# Altium PCB TS808.PcbDoc
Units mm, origin at the board's own origin, x right, y up, seen from the top; angles counter-clockwise.
Board outline 82 x 126 mm, 2 copper layers (Top Layer, Bottom Layer); 50 components, 32 nets, 123 pads, 31 vias.
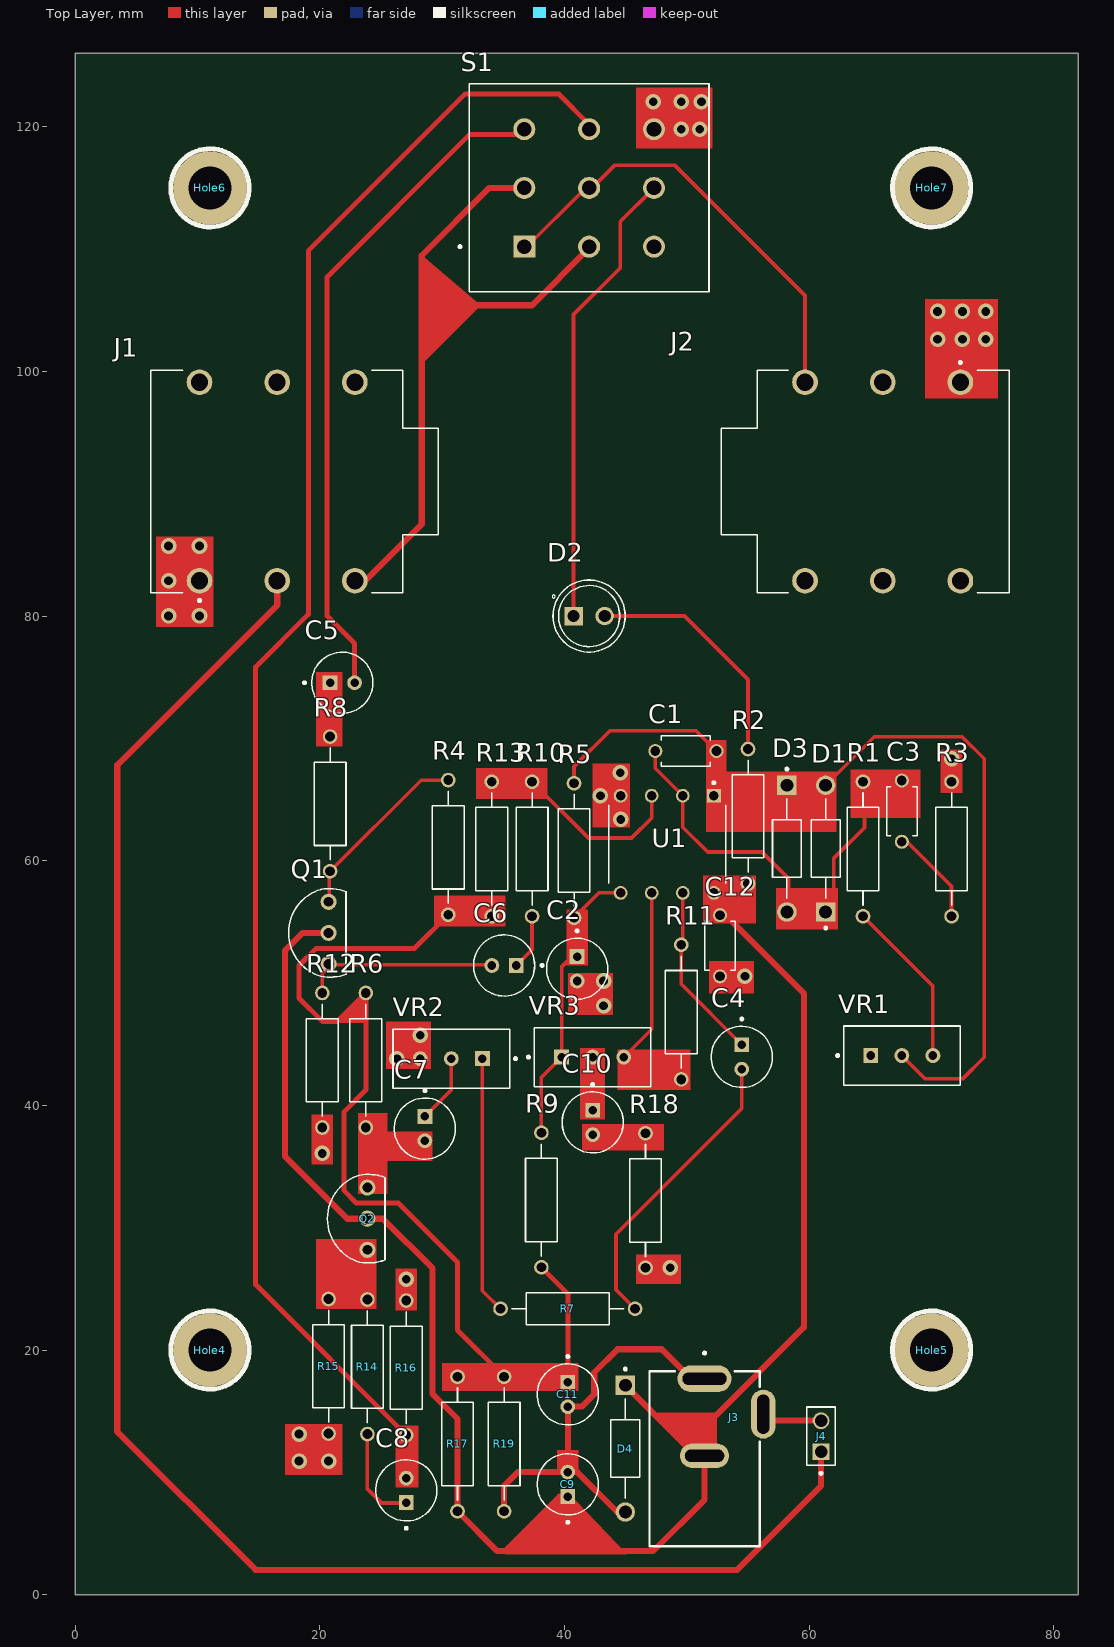
[diagram p0: Top Layer view]
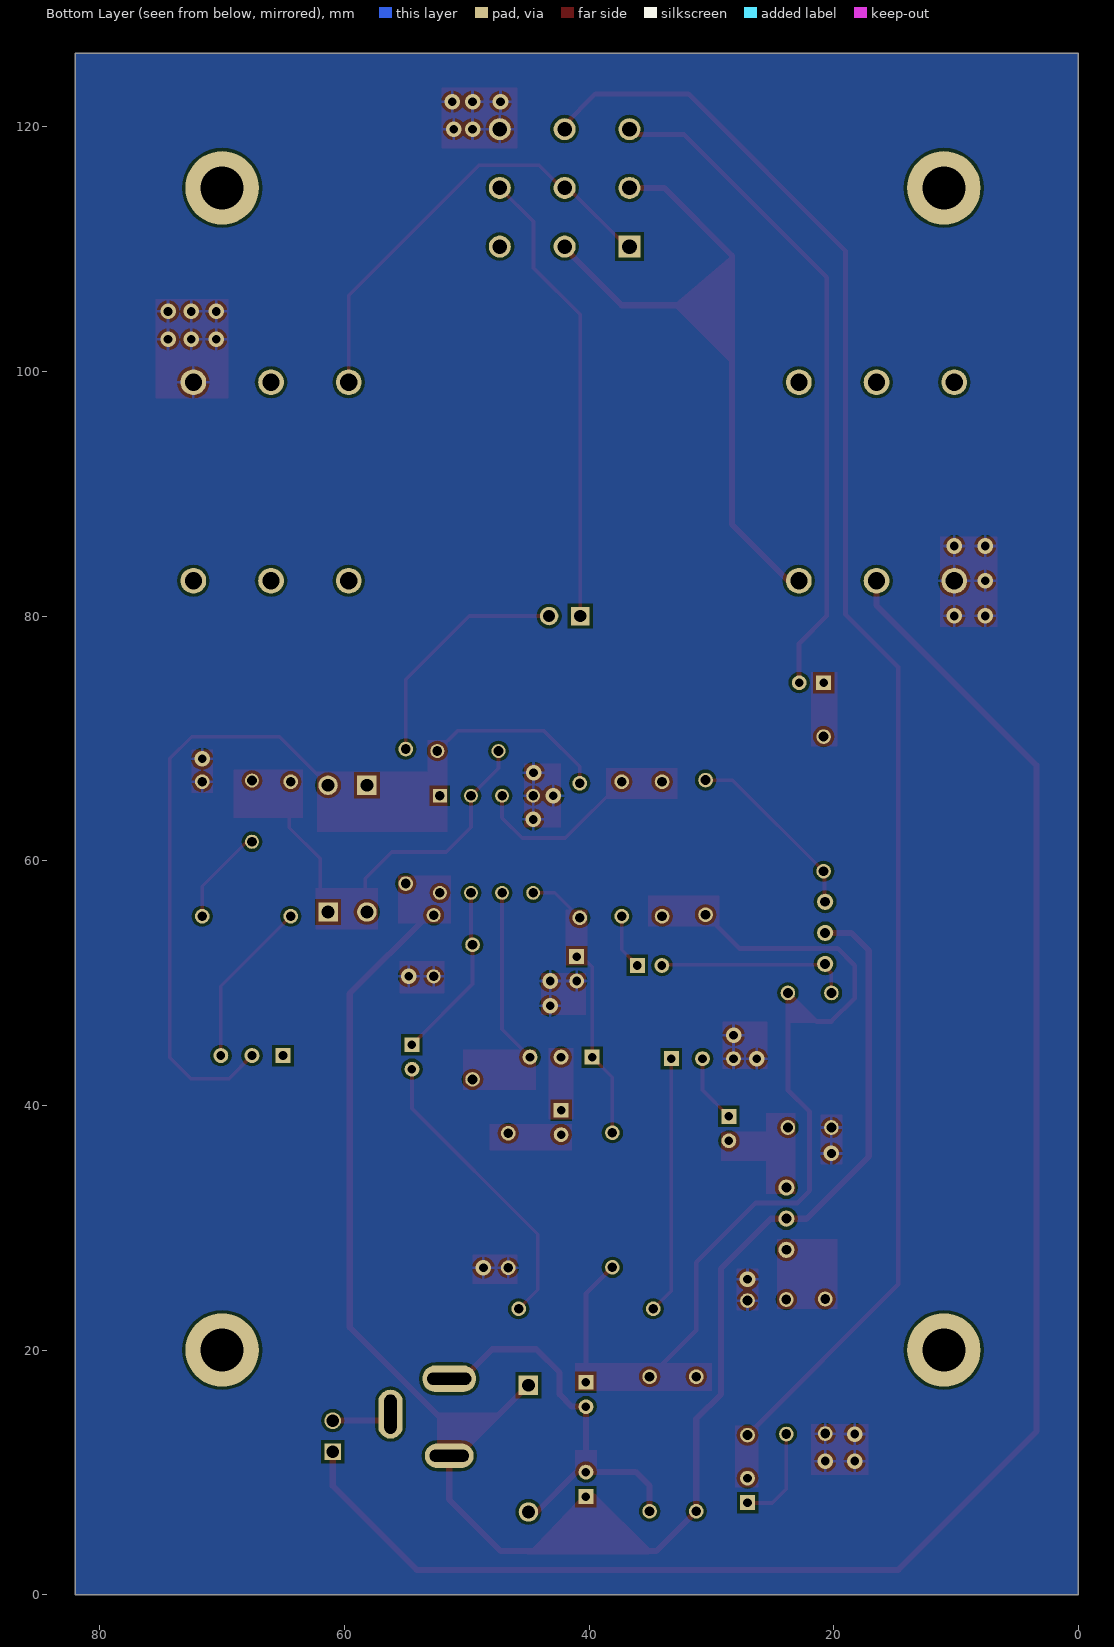
[diagram p1: Bottom Layer view, seen from below]
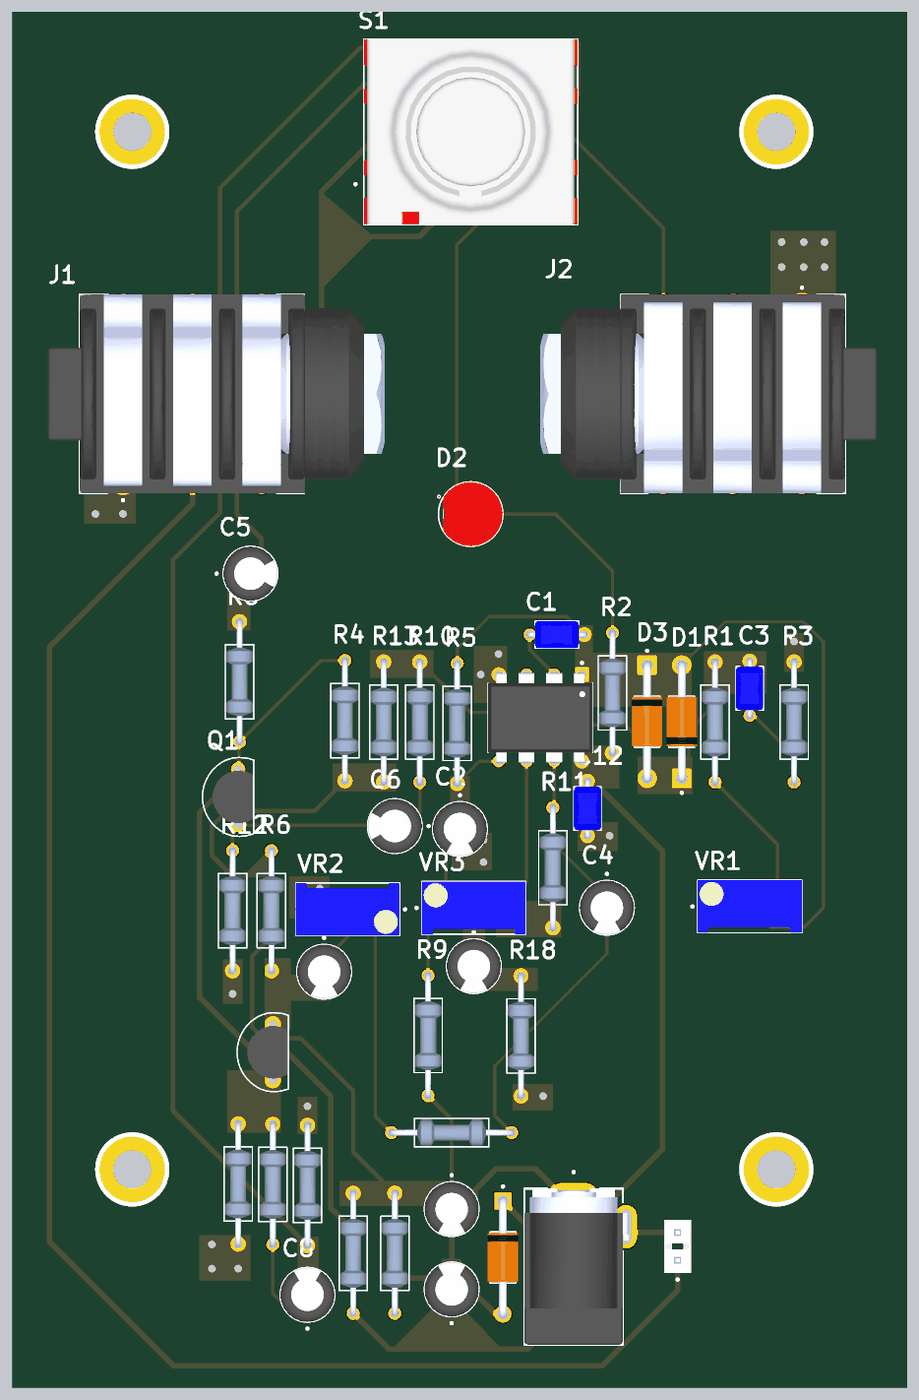
[diagram p2: 3D render of the assembled board from above, using the file's embedded part models]

## Layer stack, top to bottom
Top Solder: solder mask 0.0102, Solder Resist, Dk 3.5
Top Layer: signal copper 0.0356
Dielectric 1: dielectric 0.32, FR-4, Dk 4.8
Bottom Layer: signal copper 0.0356
Bottom Solder: solder mask 0.0102, Solder Resist, Dk 3.5

## Board outline
0,0 0,126 82,126 82,0

## Design rules (kind name [scope] priority, off if disabled: settings)
Clearance [All] p1: gap=0.254 ignorepadtopadclearanceinfootprint=FALSE except(0: Arc-Hole Track-Hole SMDPad-Hole THPad-Hole Via-Hole Fill-Hole Poly-Hole Region-Hole Text-Hole)
Height [All] p1: minheight=0 maxheight=50 prefheight=12.7
HoleSize [All] p1: absolutevalues=TRUE maxlimit=5 minlimit=0.025 maxpercent=80.000 minpercent=20.000
PolygonConnect [All] p1: connectstyle=Relief reliefconductorwidth=0.254 reliefentries=4 polygonreliefangle="90 Angle" airgapwidth=0.254
RoutingVias [All] p1: holewidth=0.711 width=1.27 viastyle="Through Hole" minholewidth=0.711 minwidth=1.27 maxholewidth=0.711 maxwidth=1.27
SolderMaskExpansion [All] p1: expansion=0.102
Width [All] p1: maxlimit=2 minlimit=0.3 preferedwidth=0.3 minimp=50.000000 maximp=50.000000 favimp=50.000000
28 further rules are at their usual default settings.

## Classes and differential pairs
component class TS808: C1 C2 C3 C4 C5 C6 C7 C8 C9 C10 C11 C12 D1 D2 D3 D4 J1 J2 J3 J4 Q1 Q2 R1 R2 R3 R4 R5 R6 R7 R8 R9 R10 R11 R12 R13 R14 R15 R16 R17 R18 R19 S1 U1 VR1 VR2 VR3

## Components (designator, comment, footprint, x,y, rotation, side; value= is the part's Value field where it differs from the comment)
C1 "51p" CAPRB500W50L400T250H550 49.911,68.961 r0 top
C2 "0.22" CAPPRD200W50D550H1250 41.021,51.165 r270 top
C3 "0.047" CAPRB500W50L400T250H550 67.564,64.048 r270 top
C4 "1uF" CAPPRD200W50D550H1250 54.483,43.958 r270 top
C5 "UVR1A470MDD" CAPPRD200W50D550H1250 21.828,74.549 r0 top
C6 "1uF" CAPPRD200W50D550H1250 35.052,51.435 r180 top
C7 "0.1" CAPPRD200W50D550H1250 28.575,38.1 r270 top
C8 "10uF" CAPPRD200W50D550H1250 27.051,8.525 r90 top
C9 "0.1uF" CAPPRD200W50D550H1250 40.259,9.017 r90 top
C10 "0.22" CAPPRD200W50D550H1250 42.291,38.608 r270 top
C11 "47uF" CAPPRD200W50D550H1250 40.259,16.367 r270 top
C12 "0.1uF" CAPRB500W50L400T250H550 52.705,53.046 r90 top
D1 "MA150" DIOAD1036W78L470D235 61.341,60.987 r90 top
D2 "LED" LED_WP7113ID 42,80 r0 top
D3 "MA150" DIOAD1036W78L470D235 58.166,60.987 r270 top
D4 "W03C" DIOAD1036W78L470D235 44.958,11.938 r270 top
Hole4 "Hole" Hole 11,20 r0 top
Hole5 "Hole" Hole 70,20 r0 top (schematic designator Hole4)
Hole6 "Hole" Hole 11,115 r0 top (schematic designator Hole4)
Hole7 "Hole" Hole 70,115 r0 top (schematic designator Hole4)
J1 "NMJ6HCD2" NEUTRIK_NMJ6HCD2 16.5,91 r180 top locked
J2 "NMJ6HCD2" NEUTRIK_NMJ6HCD2 66,91 r0 top locked
J3 "DCJ200-10-A-XX-K_REVA" GCT_DCJ200-10-A-XX-K_REVA 51.435,11.103 r0 top
J4 "3-644456-2" TE_3-644456-2 60.96,11.684 r90 top
Q1 "2SC1815" TO92 20.701,54.102 r90 top
Q2 "2SC1815" TO92 23.876,30.734 r90 top
R1 "51K" RESAD1100W55L680D260 64.389,60.96 r90 top
R2 "1k" RESAD1100W55L680D260 54.991,63.627 r90 top
R3 "4K7" RESAD1100W55L680D260 71.628,60.96 r270 top
R4 "510K" RESAD1100W55L680D260 30.48,61.087 r90 top
R5 "1K" RESAD1100W55L680D260 40.767,60.833 r90 top
R6 "510K" RESAD1100W55L680D260 23.749,43.688 r270 top
R7 "1K" RESAD1100W55L680D260 40.259,23.368 r180 top
R8 "1K" RESAD1100W55L680D260 20.828,64.643 r90 top
R9 "10K" RESAD1100W55L680D260 38.1,32.258 r270 top
R10 "RA" RESAD1100W55L680D260 37.338,60.96 r270 top
R11 "1K" RESAD1100W55L680D260 49.53,47.625 r270 top
R12 "10K" RESAD1100W55L680D260 20.193,43.688 r270 top
R13 "10K" RESAD1100W55L680D260 34.036,60.96 r270 top
R14 "100" RESAD1100W55L680D260 23.876,18.63 r270 top
R15 "10K" RESAD1100W55L680D260 20.701,18.669 r270 top
R16 "10K" RESAD1100W55L680D260 27.051,18.542 r90 top
R17 "10K" RESAD1100W55L680D260 31.242,12.319 r270 top
R18 "220" RESAD1100W55L680D260 46.609,32.219 r270 top
R19 "10K" RESAD1100W55L680D260 35.052,12.319 r90 top
S1 "FS57003PLT2B2M2QE" SW_FS57003PLT2B2M2QE 42,115 r0 top locked
U1 "RC4558P" DIP794W45P254L959H508Q8 48.387,61.341 r270 top
VR1 "500K" TRIM_3296W-1-101LF 67.564,44.069 r0 top
VR2 "100K" TRIM_3296W-1-101LF 30.734,43.815 r180 top
VR3 "20K" TRIM_3296W-1-101LF 42.291,43.942 r0 top

## Footprints (in the part's own frame and the unit in brackets; to place one, negate y for a bottom-side part, rotate by r counter-clockwise, add the part's x,y. Pads: shape width x height; smd on the part's side, far side on the other; paste and mask are expansions set on the pad)
CAPPRD200W50D550H1250 [mm]
  rect 1.208x1.208 / inner round 1.208 / far side rect 1.208x1.208 hole 0.7: 1(-1,0)
  round 1.208 hole 0.7: 2(1,0)
  silkscreen extent -3.2,-2.5 2.5,2.5, body extent -2.5,-2.5 2.5,2.5, height 12.5
CAPRB500W50L400T250H550 [mm]
  round 1.15 hole 0.8: 1(-2.5,0) 2(2.5,0)
  silkscreen extent -2,-1.25 2,1.25, body extent -2.75,-1.25 2.75,1.25, height 5.5
DIOAD1036W78L470D235 [mm]
  round 1.59 hole 1.06: A(5.18,0)
  rect 1.59x1.59 / inner round 1.59 / far side rect 1.59x1.59 hole 1.06: C(-5.18,0)
  silkscreen extent -6.6,-1.17 4.07,1.17, body extent -5.55,-1.4 5.55,1.4, height 2.8
DIP794W45P254L959H508Q8 [mm]
  rect 1.13x1.13 / inner round 1.13 / far side rect 1.13x1.13 hole 0.78 mask+0.102: 1(-3.97,3.81)
  round 1.13 hole 0.78 mask+0.102: 2(-3.97,1.27) 3(-3.97,-1.27) 4(-3.97,-3.81) 5(3.97,-3.81) 6(3.97,-1.27) 7(3.97,1.27) 8(3.97,3.81)
  silkscreen extent -5.13,-4.79 3.18,4.79, body extent -4.1,-4.79 4.1,4.79, height 5.08
GCT_DCJ200-10-A-XX-K_REVA [mm]
  oval 4.4x2.2 hole 1 slot 3.6 at 0 deg: 1(0,6.55)
  oval 4x2 hole 1 slot 3.2 at 0 deg: 2(0,0.25)
  oval 2x4 hole 1 slot 3.2 at 90 deg: 3(4.8,3.65)
  silkscreen extent -4.5,-7.15 4.5,8.75, body extent -4.5,-7.15 5.05,7.15, height 11
Hole [mm] "www.Pishnam.com"
  round 6 hole 3.5: 1(0,0)
  silkscreen extent -3.2,-3.2 3.2,3.2
LED_WP7113ID [mm]
  round 1.508 hole 1: A(1.27,0)
  rect 1.508x1.508 / inner round 1.508 / far side rect 1.508x1.508 hole 1: C(-1.27,0)
  silkscreen extent -3.03,-2.95 2.95,2.95, body extent -2.5,-2.95 2.95,2.95, height 9.6
NEUTRIK_NMJ6HCD2 [mm]
  round 2.1 hole 1.4: R(0,8.115) RN(0,-8.115) S(6.35,8.115) SN(6.35,-8.115) T(-6.35,8.115) TN(-6.35,-8.115)
  silkscreen extent -13.18,-9.1 10.35,9.83, body extent -17.64,-9.1 13.23,9.1, height 15.67
RESAD1100W55L680D260 [mm]
  round 1.2 hole 0.8: 1(-5.5,0) 2(5.5,0)
  silkscreen extent -4.58,-1.3 4.58,1.3, body extent -5.77,-1.2 5.77,1.2, height 2.4
SW_FS57003PLT2B2M2QE [mm]
  rect 1.8x1.8 / inner round 1.8 / far side rect 1.8x1.8 hole 1.2 mask+0.102: 1(-5.3,-4.8)
  round 1.8 hole 1.2 mask+0.102: 2(-5.3,0) 3(-5.3,4.8) 4(0,-4.8) 5(0,0) 6(0,4.8) 7(5.3,-4.8) 8(5.3,0) 9(5.3,4.8)
  silkscreen extent -10.65,-8.5 9.8,8.5, body extent -9.8,-8.5 9.8,8.5, height 37
TE_3-644456-2 [mm]
  rect 1.37x1.37 / inner round 1.37 / far side rect 1.37x1.37 hole 1.02: 1(0,0)
  round 1.37 hole 1.02: 2(2.54,0)
  silkscreen extent -1.87,-1.17 3.66,1.17, body extent -1.12,-1.17 3.66,1.17, height 10.03
TO92 [mil]
  round 52 hole 32: 1(-100,0) 2(0,0) 3(100,0)
  silkscreen extent -142,-57 142,129, body extent -95,-53 95,92, height 210
TRIM_3296W-1-101LF [mm]
  rect 1.218x1.218 / inner round 1.218 / far side rect 1.218x1.218 hole 0.71: 1(-2.54,0)
  round 1.218 hole 0.71: 2(0,0) 3(2.54,0)
  silkscreen extent -5.35,-2.41 4.76,2.42, body extent -4.76,-2.41 4.76,2.42, height 11.55

## Part data
C1 C3 C12: library part FG28C0G1H330JNT06, "33 pF ±5% 50V Ceramic Capacitor C0G, NP0 Radial", Package="RADIAL-2 TDK", Check_prices=https://www.snapeda.com/parts/FG28C0G1H330JNT06/TDK/view-part/?ref=eda, MF=TDK, MP=FG28C0G1H330JNT06, SnapEDA_Link=https://www.snapeda.com/parts/FG28C0G1H330JNT06/TDK/view-part/?ref=snap
C2 C4 C6 C7 C8 C9 C10 C11: library part UVR1A470MDD, "47 µF 10 V Aluminum Electrolytic Capacitors Radial, Can - 2000 Hrs @ 85°C", Package="RADIAL-2 NICHICON", Check_prices=https://www.snapeda.com/parts/UVR1A470MDD/Nichicon/view-part/?ref=eda, MF=Nichicon, MP=UVR1A470MDD, SnapEDA_Link=https://www.snapeda.com/parts/UVR1A470MDD/Nichicon/view-part/?ref=snap
C5: "47 µF 10 V Aluminum Electrolytic Capacitors Radial, Can - 2000 Hrs @ 85°C", Package="RADIAL-2 NICHICON", Check_prices=https://www.snapeda.com/parts/UVR1A470MDD/Nichicon/view-part/?ref=eda, MF=Nichicon, MP=UVR1A470MDD, SnapEDA_Link=https://www.snapeda.com/parts/UVR1A470MDD/Nichicon/view-part/?ref=snap
D1 D3 D4: library part 1N5819, "1A, 40V, Planar Schottky", Package="DO-41-2 Taiwan Semiconductor", Check_prices=https://www.snapeda.com/parts/1N5819/taiwan/view-part/?ref=eda, MF="Taiwan Semiconductor", MP=1N5819, SnapEDA_Link=https://www.snapeda.com/parts/1N5819/taiwan/view-part/?ref=snap
D2: library part WP7113ID, "Red 617nm LED Indication - Discrete 2V Radial", Package="Radial Kingbright", Availability="In Stock", Check_prices=https://www.snapeda.com/parts/WP7113ID/Kingbright/view-part/?ref=eda, MF=Kingbright, MP=WP7113ID, Price=None, Purchase-URL=https://pricing.snapeda.com/search/part/WP7113ID/?ref=eda, SnapEDA_Link=https://www.snapeda.com/parts/WP7113ID/Kingbright/view-part/?ref=snap
Hole4 Hole5 Hole6 Hole7: "ja pich", ШСЗНн КжУШ="гедПУ гНгП СЭнЪн", жИ УЗнК=www.Pishnam.com, ˜ÇäÇá Êá�ÑÇã=@Pishnam
J1 J2: "1/4 stereo jack, switched, with chrome ferrule and straight PCB pins, mounting nut included", Package=None, Availability="In Stock", Check_prices=https://www.snapeda.com/parts/NMJ6HCD2/Neutrik/view-part/?ref=eda, MF=Neutrik, MP=NMJ6HCD2, Price=None, Purchase-URL=https://pricing.snapeda.com/search/part/NMJ6HCD2/?ref=eda, SnapEDA_Link=https://www.snapeda.com/parts/NMJ6HCD2/Neutrik/view-part/?ref=snap
J3: "Power Barrel Connector Jack 2.05mm ID (0.081), 5.50mm OD (0.217) Through Hole, Right Angle", Package=None, Check_prices=https://www.snapeda.com/parts/DCJ200-10-A-K1-K/Global+Connector+Technology/view-part/?ref=eda, MF="Global Connector Technology", MP=DCJ200-10-A-K1-K, SnapEDA_Link=https://www.snapeda.com/parts/DCJ200-10-A-K1-K/Global+Connector+Technology/view-part/?ref=snap
J4: "HEADER ASSEMBLY, NARROW, MTA-100, 2 POSITION, STRAIGHT", Package=None, Check_prices=https://www.snapeda.com/parts/3-644456-2/TE+Connectivity+AMP+Connectors/view-part/?ref=eda, MF="TE Connectivity", MP=3-644456-2, SnapEDA_Link=https://www.snapeda.com/parts/3-644456-2/TE+Connectivity+AMP+Connectors/view-part/?ref=snap
Q1 Q2: "TRANS NPN ECB 150mA 60V TO-92", Package=None, Check_prices=https://www.snapeda.com/parts/2SC1815/Techno/view-part/?ref=eda, MF="Lumimax Optoelectronic Technology", MP=2SC1815, SnapEDA_Link=https://www.snapeda.com/parts/2SC1815/Techno/view-part/?ref=snap
R1 R2 R3 R4 R5 R6 R7 R8 R9 R10 R11 R12 R13 R14 R15 R16 R17 R18 R19: library part MFR-25FBF52-10K, "10.2 kOhms ±1% 0.25W, 1/4W Through Hole Resistor Axial - Metal Film", Package="RADIAL-2 YAGEO", Check_prices=https://www.snapeda.com/parts/MFR-25FBF52-10K/Yageo/view-part/?ref=eda, MF=Yageo, MP=MFR-25FBF52-10K, SnapEDA_Link=https://www.snapeda.com/parts/MFR-25FBF52-10K/Yageo/view-part/?ref=snap
S1: "PUSHBUTTON, 1A, 9VDC 3PDT, On-On, Panel Mount, Rear", Package=None, Check_prices=https://www.snapeda.com/parts/FS57003PLT2B2M2QE/E-Switch/view-part/?ref=eda, MF="e-switch inc", MP=FS57003PLT2B2M2QE, SnapEDA_Link=https://www.snapeda.com/parts/FS57003PLT2B2M2QE/E-Switch/view-part/?ref=snap
U1: "Dual, 30-V, 3-MHz, low noise (8-nV/√Hz) operational amplifier", Package="PDIP-8 Texas", Check_prices=https://www.snapeda.com/parts/RC4558P/Texas+Instruments/view-part/?ref=eda, MF="Texas Instruments", MP=RC4558P, SnapEDA_Link=https://www.snapeda.com/parts/RC4558P/Texas+Instruments/view-part/?ref=snap
VR1 VR2 VR3: library part 3296W-1-101LF, "3/8 Sq, Thru-Hole, TRIMMER, 100 ohms, Cermet, 25 Turns, Pwr-Rtg 0.5W", Package="NON STANDARD-3 Bourns", Check_prices=https://www.snapeda.com/parts/3296W-1-101LF/Bourns/view-part/?ref=eda, MF=Bourns, MP=3296W-1-101LF, SnapEDA_Link=https://www.snapeda.com/parts/3296W-1-101LF/Bourns/view-part/?ref=snap

## Via types
v1: diameter 1.27, hole 0.711, Top Layer to Bottom Layer, tented both sides, 31 vias

## Nets (pads, with @x,y where several pads share a name; then routed paths per layer and width w, separated by ;. In a path a pad name is that pad's centre, name@x,y a point inside that pad or via, vN(x,y) a via of type N, cw(c..) or ccw(c..) an arc to the next point about the centre after c; other vN are vias at no path point)
2OUT: C4.1 R11.1 U1.7 | length 14.5
  Top Layer w0.3: U1.7 49.657,53.252 R11.1 49.53,49.911 C4.1
4V5: C11.1 R4.1 R6.1 R9.2 R13.2 R17.1 R19.2 | length 73.6
  Top Layer w0.4: R4.1 27.725,52.832 19.685,52.832 18.288,51.435 18.288,48.768 20.193,46.863 21.424,46.863 R6.1 23.749,41.256 21.971,39.478 21.971,33.02 22.987,32.004 26.416,32.004 31.242,27.178 31.242,21.629 R19.2 ; R9.2 40.259,24.599 C11.1
AudioIn: J1.T S1.2 S1.4 | length 55.7
  Top Layer w0.5: J1.T 23.703,82.885 28.321,87.503 28.321,105.41 37.338,105.41 41.904,109.976 S1.4@42.225,109.976 ; 28.321,105.537 28.321,109.474 33.847,115 S1.2 S1.2@36.703,115
BAT+: J3.3 J4.2 | length 4.9
  Top Layer w0.5: J3.3 56.764,14.224 J4.2
BAT-: J1.R J4.1 | length 142.8
  Top Layer w0.5: J1.R@16.51,82.885 16.51,80.899 3.429,67.818 3.429,13.335 14.732,2.032 54.102,2.032 60.96,8.89 J4.1
CircuitIn: C5.2 S1.3 | length 55.1
  Top Layer w0.4: C5.2 22.828,77.756 20.574,80.01 20.574,107.696 32.258,119.38 36.677,119.38 S1.3@36.703,119.354
CircuitOut: C8.2 R16.1 S1.6 | length 133.6
  Top Layer w0.4: R16.1 14.732,25.361 14.732,75.819 19.05,80.137 19.05,109.855 31.877,122.682 39.497,122.682 42.003,120.176 S1.6@42.003,119.634
GND: C2.2 C12.1 J1.S J2.S R3.1 R12.2 R15.2 R16.2 R18.2 S1.9 U1.4 VR2.3 | length 1.7
  Top Layer w0.3: v1(42.926,65.311) U1.4
  other v1: 18.288,10.922 20.701,10.922 18.288,13.13 27.051,25.781 48.641,26.719 20.193,36.068 26.289,43.815 28.194,45.72 43.18,48.133 43.18,50.165 54.737,50.546 44.577,63.373 44.544,67.183 71.628,68.326 7.62,80.01 10.15,80.01 7.62,82.885 7.62,85.725 10.15,85.725 70.485,102.616 72.517,102.616 74.422,102.616 70.485,104.902 72.517,104.902 74.422,104.902 49.53,119.8 51.054,119.8 47.244,122.047 49.53,122.047 51.181,122.047
IN1+: R10.1 R13.1 U1.3 | length 14.2
  Top Layer w0.3: R10.1 41.949,61.849 45.466,61.849 47.117,63.5 U1.3
IN2+: C2.1 R5.1 R9.1 U1.5 VR3.1 | length 20.5
  Top Layer w0.3: R9.1 38.1,42.291 VR3.1 39.751,51.308 40.608,52.165 C2.1 ; R5.1 42.805,57.371 U1.5
IN2-: R11.2 U1.6 VR3.3 | length 14.4
  Top Layer w0.3: VR3.3 47.117,46.228 U1.6
Jack_pin1: C9.2 C11.2 D4.A J3.1 R19.1 | length 34.3
  Top Layer w0.5: R19.1 35.052,8.89 36.195,10.033 40.243,10.033 C9.2 ; D4.A 44.296,6.758 41.037,10.017 C9.2 ; J3.1 50.335,17.653 47.922,20.066 44.323,20.066 42.418,18.161 42.418,16.383 41.408,15.373 40.265,15.373 C11.2 C9.2
Jack_pin2: C9.1 C12.2 D4.C J3.2 Q1.2 Q2.2 R2.1 R17.2 U1.8 | length 148.9
  Top Layer w0.5: Q1.2 18.581,54.102 17.145,52.666 17.145,35.814 22.225,30.734 Q2.2 25.146,30.734 29.21,26.67 29.21,16.395 31.242,14.363 R17.2 34.505,3.556 35.141,3.556 39.602,8.017 C9.1 40.259,5.908 42.611,3.556 47.222,3.556 51.435,7.769 J3.2 ; D4.C 50.723,11.353 J3.2 ; C12.2 53.166,55.546 59.563,49.149 59.563,21.844 52.185,14.466 52.185,12.046 51.492,11.353 J3.2
LED-: D2.C S1.8 | length 37.7
  Top Layer w0.3: D2.C 40.73,104.644 44.544,108.458 44.544,112.244 S1.8
NetC1_1: C1.1 C3.1 D1.C D3.A R1.2 U1.2 | length 32.3
  Top Layer w0.3: C1.1 47.411,67.557 U1.2 49.657,62.738 51.689,60.706 56.134,60.706 58.293,58.547 58.293,55.934 D3.A ; D1.C 61.986,56.452 61.986,60.172 64.516,62.702 64.516,66.333 R1.2
NetC1_2: C1.2 D1.A D3.C R5.2 U1.1 VR1.2 | length 62.9
  Top Layer w0.3: R5.2 40.767,67.691 43.688,70.612 50.76,70.612 C1.2 ; D1.A 65.317,70.143 72.478,70.143 74.295,68.326 74.295,43.942 72.517,42.164 69.469,42.164 VR1.2
NetC3_2: C3.2 R3.2 | length 8
  Top Layer w0.3: C3.2 67.992,61.548 71.628,57.912 R3.2
NetC4_2: C4.2 R7.1 | length 24.5
  Top Layer w0.3: R7.1 44.196,24.931 44.196,29.464 54.483,39.751 C4.2
NetC5_1: C5.1 R8.2
NetC6_1: C6.1 R10.2 | length 4.6
  Top Layer w0.3: C6.1 37.338,52.721 R10.2
NetC6_2: C6.2 Q1.1 R12.1 | length 16
  Top Layer w0.3: R12.1 20.193,50.778 20.701,51.286 Q1.1 20.764,51.498 33.988,51.498 C6.2
NetC7_1: C7.1 VR2.2 | length 5.6
  Top Layer w0.3: C7.1 30.734,41.259 VR2.2
NetC7_2: C7.2 Q2.3 R6.2
NetC8_1: C8.1 R14.2 | length 8.2
  Top Layer w0.3: R14.2 23.876,8.636 25.019,7.493 27.019,7.493 C8.1
NetC10_1: C10.1 VR3.2
NetC10_2: C10.2 R18.1
NetD2_A: D2.A R2.2 | length 19.5
  Top Layer w0.3: D2.A 49.794,80 54.991,74.803 R2.2
NetQ1_3: Q1.3 R4.2 R8.1 | length 15.3
  Top Layer w0.3: Q1.3 20.764,56.706 20.764,59.08 R8.1 28.272,66.587 R4.2
NetQ2_1: Q2.1 R14.1 R15.1
NetR1_1: R1.1 VR1.3 | length 13.8
  Top Layer w0.3: R1.1 70.104,49.745 VR1.3
NetR7_2: R7.2 VR2.1 | length 21.1
  Top Layer w0.3: VR2.1 33.274,24.853 R7.2
OutJack: J2.T S1.1 S1.5 | length 37.5
  Top Layer w0.3: S1.1@36.703,109.754 36.703,109.974 41.729,115 S1.5 42.229,115 44.069,116.84 49.022,116.84 59.65,106.212 J2.T
pads on no net: Hole4.1 Hole5.1 Hole6.1 Hole7.1 J1.RN J1.SN J1.TN J2.R J2.RN J2.SN J2.TN S1.7 VR1.1

## Polygon pours and split planes (outlines as drawn)
GND on Bottom Layer "GND_L02_P002" (solid, remove dead copper, pour order 2): 0,0 82,0 82,126 0,126

## Other copper
Top Layer:
  rectangle net GND: 45.847,25.4 49.53,27.813
  rectangle net GND: 45.847,118.237 52.07,123.19
  rectangle net GND: 19.304,35.179 21.082,39.243
  rectangle net GND: 25.4,42.958 29.083,46.863
  rectangle net GND: 51.816,49.149 55.499,51.816
  rectangle net GND: 40.259,47.371 43.942,50.8
  rectangle net GND: 42.291,62.702 45.339,67.945
  rectangle net GND: 70.739,65.532 72.517,69.088
  rectangle net GND: 6.604,79.121 11.303,86.487
  rectangle net GND: 69.469,97.79 75.438,105.918
  rectangle net GND: 26.162,23.241 27.94,26.67
  rectangle net GND: 17.145,9.779 21.844,13.97
  rectangle net Jack_pin1: 39.37,9.779 41.148,11.811
  rectangle net 4V5: 29.972,16.637 41.148,18.923
  rectangle net NetC10_2: 41.402,36.322 48.133,38.481
  rectangle net NetC10_1: 41.275,38.862 43.307,44.704
  rectangle net CircuitOut: 26.162,8.763 28.067,13.843
  rectangle net NetQ2_1: 19.685,23.368 24.638,29.083
  rectangle net NetC7_2: 23.749,35.433 29.21,37.846
  rectangle net NetC7_2: 23.114,32.766 25.527,39.37
  rectangle net NetC5_1: 19.685,69.342 21.844,75.438
  rectangle net 4V5: 29.337,54.61 35.179,57.15
  rectangle net IN1+: 32.766,65.024 38.608,67.564
  rectangle net IN2+: 40.132,51.435 41.91,56.007
  rectangle net NetC1_2: 51.562,64.516 53.213,69.85
  rectangle net IN2-: 44.323,41.275 50.292,44.577
  rectangle net Jack_pin2: 51.308,54.864 55.626,58.801
  rectangle net NetC1_1: 63.373,63.5 69.088,67.437
  rectangle net NetC1_1: 57.277,54.356 62.357,57.785
  rectangle net NetC1_2: 51.562,62.357 62.23,67.31
  region net Jack_pin2: 52.185,14.753
  region net Jack_pin2: 52.317,14.859 47.217,14.859 50.723,11.353 52.331,11.353
  region net 4V5: 21.463,46.736 23.749,46.736 23.749,49.188
  region net Jack_pin2: 45.092,3.302 35.141,3.302 40.132,8.509
  region net Jack_pin2: 42.611,3.556
  region net AudioIn: 33.147,105.41 28.321,100.584 28.321,105.41
  region net AudioIn: 33.274,105.283 28.321,109.474 28.321,105.283
  region: 35.941,102.362

## Silkscreen, mask and mechanical layers (free items; w line width, h text height)
Mechanical 1:
  the board outline again, w1